# EAGLE board sample (EAGLE 9.6.2)
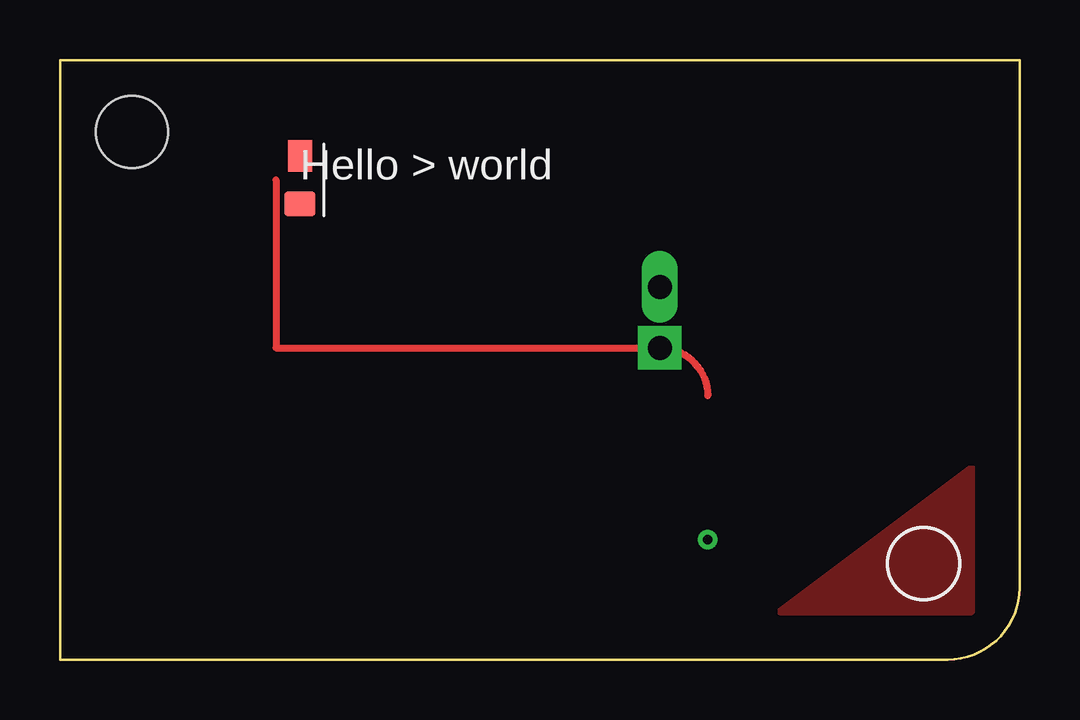
[diagram p0: board, top side]
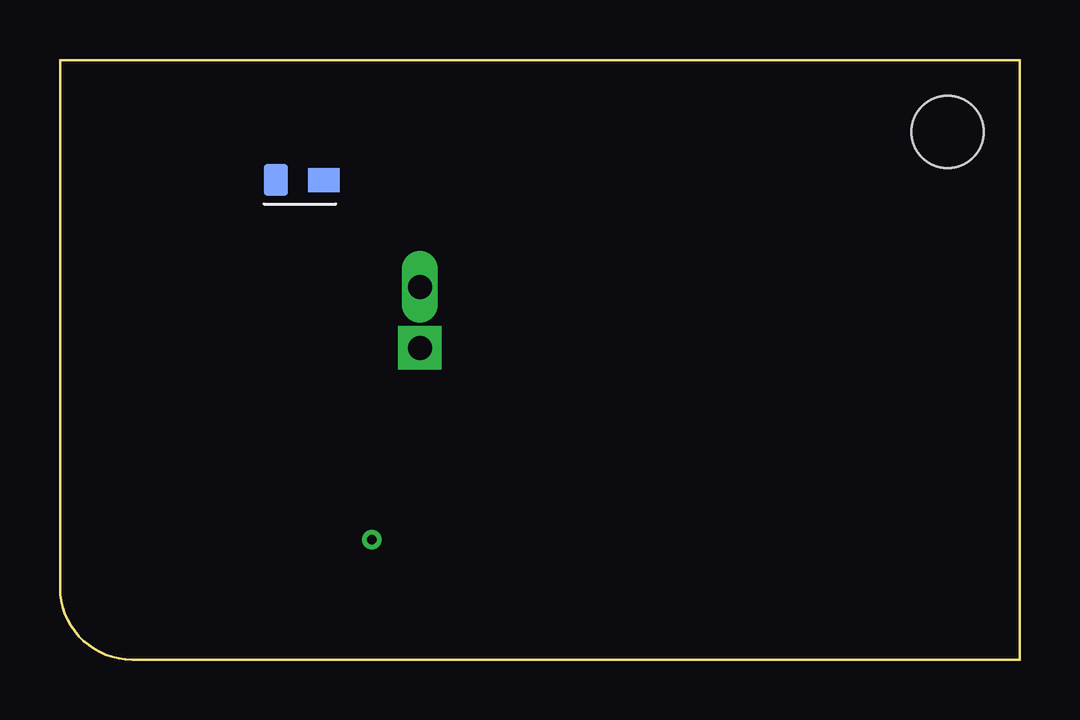
[diagram p1: board, bottom side, seen from below]

Size 40 x 25 mm. Coordinates in mm from the lower left corner, seen from the top.
Outline: 0,0 37,0 arc90 40,3 40,25 0,25 0,0
Copper layers used: Top
Holes 3 mm at 3,22

## Footprints (pad centres in the part's own frame; a part is rotated, then mirrored left to right if it is on the bottom)
PIN2 = drill 1 pad 1.8 square: 1 0,0 | drill 1 long: 2 0,2.54
R0805 = smd 1 x 1.3: 1 -1,0 | smd 1.3 x 1: 2 1,0

## Placement (x,y rotation side)
J1  [PIN2]  25,13 0 top
R1  10k  [R0805]  10,20 90 top
R2  1k  [R0805]  30,20 0 bottom

## Library data of the parts
J1 = con
R1 R2 = rcl

## Nets
VCC: R1.1

## Tracks (layer width: path | path; a pad name or v marks a point on that pad's centre or on a via)
VCC  (via drill 0.4)
  Top 0.3: 9,20 9,13 25,13 arc-90 27,11
  other vias: 27,5
  pour Top (isolate 0.3): 30,2 38,2 38,8

## Text on the board
tPlace: Hello > world